# Altium PCB Pod_Islands_Panel.PcbDoc (part 3 of 10)
Units mm, origin at the board's own origin, x right, y up, seen from the top; angles counter-clockwise.
Board outline 95.7 x 83.7 mm, 6 copper layers (Top Layer, Inner1, Inner2, Inner3, Inner4, Bottom Layer), stack 0.82 mm thick; 1100 components, 940 nets, 4944 pads, 3680 vias.
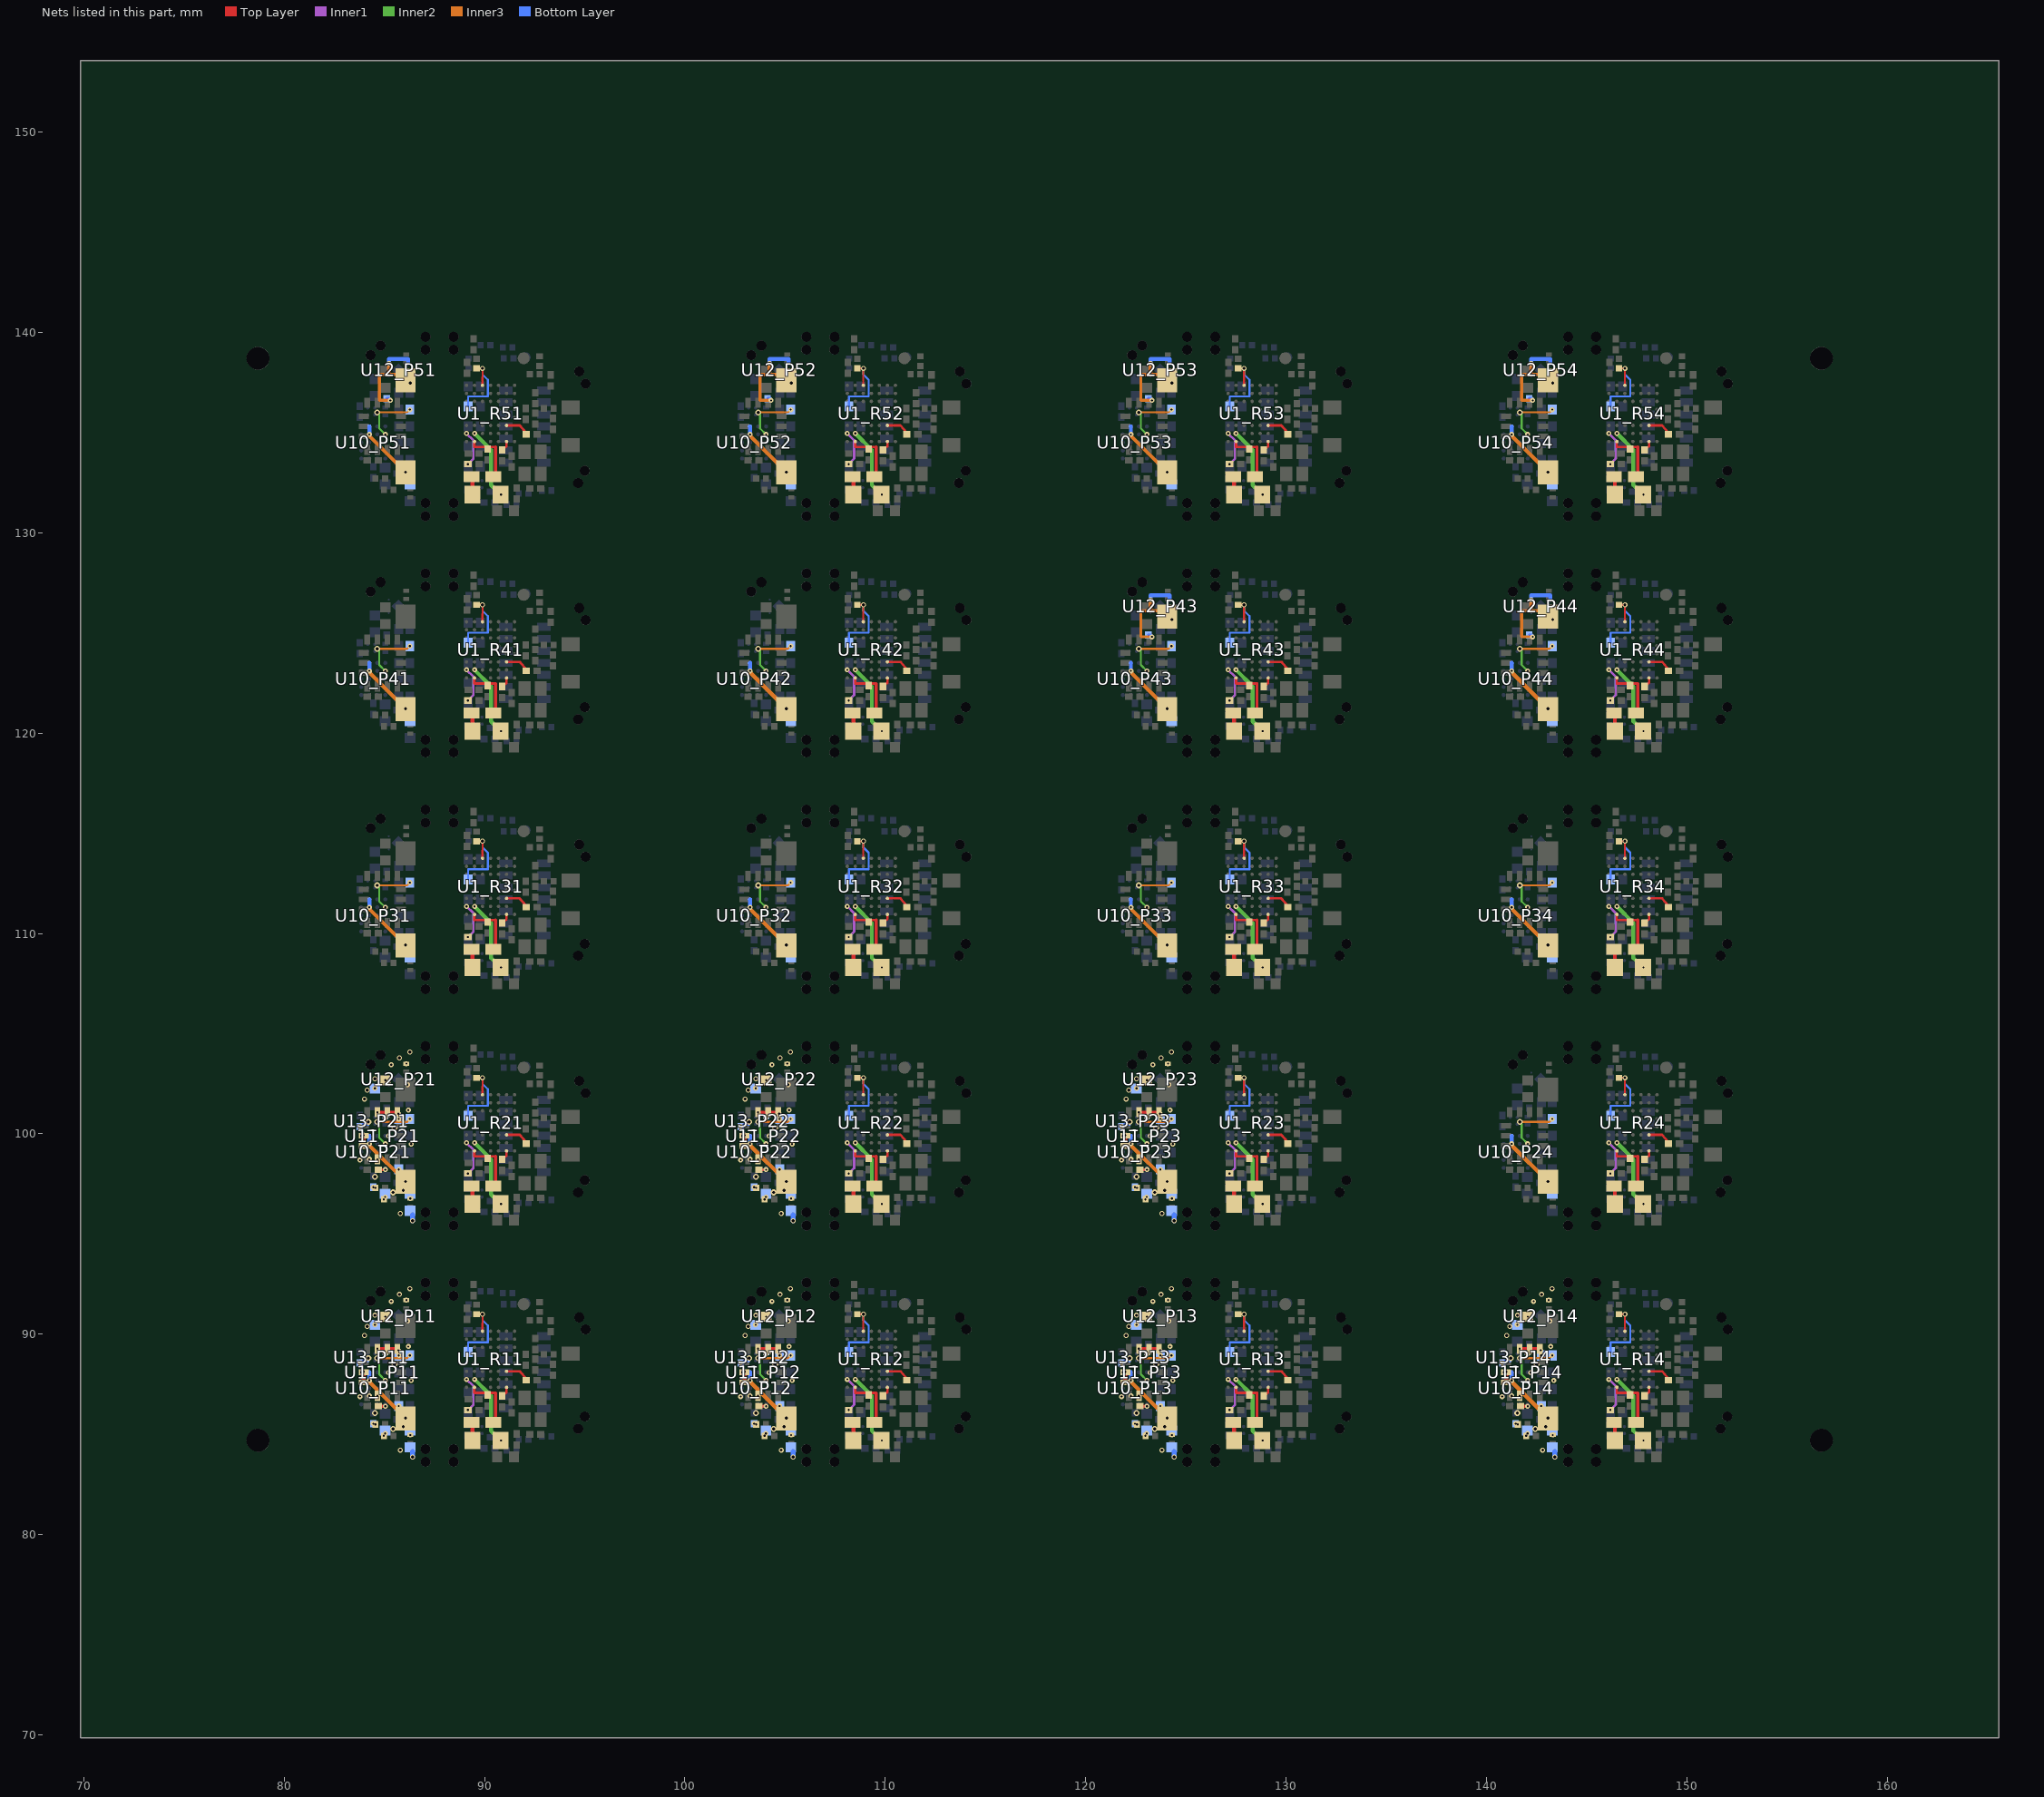
[diagram p7: the nets of this part, all layers, seen from the top]

## Via types
v1: diameter 0.249, hole 0.102, Top Layer to Inner1, 920 vias
v2: diameter 0.249, hole 0.102, Inner1 to Bottom Layer, 740 vias
v3: diameter 0.249, hole 0.102, Top Layer to Inner4, 580 vias
v4: diameter 0.249, hole 0.152, Top Layer to Bottom Layer, 540 vias
v5: diameter 0.249, hole 0.102, Inner4 to Bottom Layer, 520 vias
v6: diameter 0.3, hole 0.152, Inner1 to Inner4, 380 vias

## Nets (pads, with @x,y where several pads share a name; then routed paths per layer and width w, separated by ;. In a path a pad name is that pad's centre, name@x,y a point inside that pad or via, vN(x,y) a via of type N, cw(c..) or ccw(c..) an arc to the next point about the centre after c; other vN are vias at no path point) (continued)
CELL_N_P43: C55_P43.2 pad.BT2@124.059,125.8 U12_P43.2 U12_P43.3 | length 6.3
  Top Layer w0.3: pad.BT2@124.059,125.8 124.2,125.66 v4(124.3,125.66)
  Inner3 w0.15: v2(123.3,124.8) 122.75,124.8 122.75,126.1 123.226,126.1 124.3,126.1 v4(124.3,125.66)
  Inner3 w0.2: 123.226,126.1 v2(123.226,126.646)
  Bottom Layer w0.15: C55_P43.2@123.12,124.89 123.27,124.89 v2(123.3,124.8)
  Bottom Layer w0.2: v2(123.226,126.646) 123.226,126.87 124.176,126.87 U12_P43.3@124.176,126.646
CELL_N_P44: C55_P44.2 pad.BT2@143.058,125.8 U12_P44.2 U12_P44.3 | length 6.3
  Top Layer w0.3: pad.BT2@143.06,125.8 143.2,125.66 v4(143.3,125.66)
  Inner3 w0.15: v2(142.3,124.8) 141.75,124.8 141.75,126.1 142.226,126.1 143.3,126.1 v4(143.3,125.66)
  Inner3 w0.2: 142.226,126.1 v2(142.226,126.646)
  Bottom Layer w0.15: C55_P44.2@142.12,124.89 142.27,124.89 v2(142.3,124.8)
  Bottom Layer w0.2: v2(142.226,126.646) 142.226,126.87 143.176,126.87 U12_P44.3@143.176,126.646
CELL_N_P51: C55_P51.2 pad.BT2@86.058,137.601 U12_P51.2 U12_P51.3 | length 6.3
  Top Layer w0.3: pad.BT2@86.06,137.6 86.2,137.46 v4(86.3,137.46)
  Inner3 w0.15: v2(85.3,136.6) 84.75,136.6 84.75,137.9 85.226,137.9 86.3,137.9 v4(86.3,137.46)
  Inner3 w0.2: 85.226,137.9 v2(85.226,138.446)
  Bottom Layer w0.15: C55_P51.2@85.12,136.691 85.27,136.69 v2(85.3,136.6)
  Bottom Layer w0.2: v2(85.226,138.446) 85.226,138.67 86.176,138.67 U12_P51.3@86.176,138.446
CELL_N_P52: C55_P52.2 pad.BT2@105.06,137.601 U12_P52.2 U12_P52.3 | length 6.3
  Top Layer w0.3: pad.BT2@105.06,137.6 105.2,137.46 v4(105.3,137.46)
  Inner3 w0.15: v2(104.3,136.6) 103.75,136.6 103.75,137.9 104.226,137.9 105.3,137.9 v4(105.3,137.46)
  Inner3 w0.2: 104.226,137.9 v2(104.226,138.446)
  Bottom Layer w0.15: C55_P52.2@104.12,136.691 104.27,136.69 v2(104.3,136.6)
  Bottom Layer w0.2: v2(104.226,138.446) 104.226,138.67 105.176,138.67 U12_P52.3@105.176,138.446
CELL_N_P53: C55_P53.2 pad.BT2@124.059,137.601 U12_P53.2 U12_P53.3 | length 6.3
  Top Layer w0.3: pad.BT2@124.06,137.6 124.2,137.46 v4(124.3,137.46)
  Inner3 w0.15: v2(123.3,136.6) 122.75,136.6 122.75,137.9 123.226,137.9 124.3,137.9 v4(124.3,137.46)
  Inner3 w0.2: 123.226,137.9 v2(123.226,138.446)
  Bottom Layer w0.15: C55_P53.2@123.12,136.691 123.27,136.69 v2(123.3,136.6)
  Bottom Layer w0.2: v2(123.226,138.446) 123.226,138.67 124.176,138.67 U12_P53.3@124.176,138.446
CELL_N_P54: C55_P54.2 pad.BT2@143.058,137.601 U12_P54.2 U12_P54.3 | length 6.3
  Top Layer w0.3: pad.BT2@143.06,137.6 143.2,137.46 v4(143.3,137.46)
  Inner3 w0.15: v2(142.3,136.6) 141.75,136.6 141.75,137.9 142.226,137.9 143.3,137.9 v4(143.3,137.46)
  Inner3 w0.2: 142.226,137.9 v2(142.226,138.446)
  Bottom Layer w0.15: C55_P54.2@142.12,136.691 142.27,136.69 v2(142.3,136.6)
  Bottom Layer w0.2: v2(142.226,138.446) 142.226,138.67 143.176,138.67 U12_P54.3@143.176,138.446
CELL_P_P11: C52_P11.1 pad.BT1@86.058,85.8 R51_P11.1 U10_P11.A3 U10_P11.B3 | length 3.6
  Top Layer w0.3: pad.BT1@86.06,85.801 v4(86.06,85.82)
  Inner3 w0.2: v2(84.251,87.7) 84.251,87.625 86.06,85.816 v4(86.06,85.82)
  Bottom Layer w0.2: v2(84.251,87.7) U10_P11.A3@84.251,88.099
  Bottom Layer w0.25: v4(86.06,85.82) 86.06,85.782 R51_P11.1@86.093,85.75 ; R51_P11.1@86.093,85.748 86.2,85.64 C52_P11.1@86.2,85.35
CELL_P_P12: C52_P12.1 pad.BT1@105.06,85.8 R51_P12.1 U10_P12.A3 U10_P12.B3 | length 3.6
  Top Layer w0.3: pad.BT1@105.06,85.8 v4(105.06,85.82)
  Inner3 w0.2: v2(103.251,87.7) 103.251,87.625 105.06,85.816 v4(105.06,85.82)
  Bottom Layer w0.2: v2(103.251,87.7) U10_P12.A3@103.25,88.1
  Bottom Layer w0.25: v4(105.06,85.82) 105.06,85.782 R51_P12.1@105.092,85.75 ; R51_P12.1@105.093,85.748 105.2,85.64 C52_P12.1@105.2,85.35
CELL_P_P13: C52_P13.1 pad.BT1@124.059,85.8 R51_P13.1 U10_P13.A3 U10_P13.B3 | length 3.6
  Top Layer w0.3: pad.BT1@124.06,85.801 v4(124.06,85.82)
  Inner3 w0.2: v2(122.251,87.7) 122.251,87.625 124.06,85.816 v4(124.06,85.82)
  Bottom Layer w0.2: v2(122.251,87.7) U10_P13.A3@122.25,88.1
  Bottom Layer w0.25: v4(124.06,85.82) 124.06,85.782 R51_P13.1@124.092,85.75 ; R51_P13.1@124.093,85.748 124.2,85.64 C52_P13.1@124.2,85.35
CELL_P_P14: C52_P14.1 pad.BT1@143.058,85.8 R51_P14.1 U10_P14.A3 U10_P14.B3 | length 3.6
  Top Layer w0.3: pad.BT1@143.06,85.801 v4(143.06,85.82)
  Inner3 w0.2: v2(141.251,87.7) 141.251,87.625 143.06,85.816 v4(143.06,85.82)
  Bottom Layer w0.2: v2(141.251,87.7) U10_P14.A3@141.251,88.099
  Bottom Layer w0.25: v4(143.06,85.82) 143.06,85.782 R51_P14.1@143.093,85.75 ; R51_P14.1@143.093,85.748 143.2,85.64 C52_P14.1@143.2,85.35
CELL_P_P21: C52_P21.1 pad.BT1@86.058,97.601 R51_P21.1 U10_P21.A3 U10_P21.B3 | length 3.6
  Top Layer w0.3: pad.BT1@86.06,97.601 v4(86.06,97.62)
  Inner3 w0.2: v2(84.251,99.5) 84.251,99.425 86.06,97.616 v4(86.06,97.62)
  Bottom Layer w0.2: v2(84.251,99.5) U10_P21.A3@84.251,99.899
  Bottom Layer w0.25: v4(86.06,97.62) 86.06,97.582 R51_P21.1@86.093,97.55 ; R51_P21.1@86.093,97.548 86.2,97.44 C52_P21.1@86.2,97.15
CELL_P_P22: C52_P22.1 pad.BT1@105.06,97.601 R51_P22.1 U10_P22.A3 U10_P22.B3 | length 3.6
  Top Layer w0.3: pad.BT1@105.06,97.601 v4(105.06,97.62)
  Inner3 w0.2: v2(103.251,99.5) 103.251,99.425 105.06,97.616 v4(105.06,97.62)
  Bottom Layer w0.2: v2(103.251,99.5) U10_P22.A3@103.251,99.899
  Bottom Layer w0.25: v4(105.06,97.62) 105.06,97.582 R51_P22.1@105.093,97.55 ; R51_P22.1@105.093,97.548 105.2,97.44 C52_P22.1@105.2,97.15
CELL_P_P23: C52_P23.1 pad.BT1@124.059,97.601 R51_P23.1 U10_P23.A3 U10_P23.B3 | length 3.6
  Top Layer w0.3: pad.BT1@124.06,97.601 v4(124.06,97.62)
  Inner3 w0.2: v2(122.251,99.5) 122.251,99.425 124.06,97.616 v4(124.06,97.62)
  Bottom Layer w0.2: v2(122.251,99.5) U10_P23.A3@122.251,99.899
  Bottom Layer w0.25: v4(124.06,97.62) 124.06,97.582 R51_P23.1@124.093,97.55 ; R51_P23.1@124.093,97.548 124.2,97.44 C52_P23.1@124.2,97.15
CELL_P_P24: C52_P24.1 pad.BT1@143.058,97.601 R51_P24.1 U10_P24.A3 U10_P24.B3 | length 3.6
  Top Layer w0.3: pad.BT1@143.06,97.601 v4(143.06,97.62)
  Inner3 w0.2: v2(141.251,99.5) 141.251,99.425 143.06,97.616 v4(143.06,97.62)
  Bottom Layer w0.2: v2(141.251,99.5) U10_P24.A3@141.251,99.899
  Bottom Layer w0.25: v4(143.06,97.62) 143.06,97.582 R51_P24.1@143.093,97.55 ; R51_P24.1@143.093,97.548 143.2,97.44 C52_P24.1@143.2,97.15
CELL_P_P31: C52_P31.1 pad.BT1@86.058,109.4 R51_P31.1 U10_P31.A3 U10_P31.B3 | length 3.6
  Top Layer w0.3: pad.BT1@86.06,109.401 v4(86.06,109.42)
  Inner3 w0.2: v2(84.251,111.3) 84.251,111.225 86.06,109.416 v4(86.06,109.42)
  Bottom Layer w0.2: v2(84.251,111.3) U10_P31.A3@84.251,111.699
  Bottom Layer w0.25: v4(86.06,109.42) 86.06,109.382 R51_P31.1@86.093,109.35 ; R51_P31.1@86.093,109.348 86.2,109.24 C52_P31.1@86.2,108.95
CELL_P_P32: C52_P32.1 pad.BT1@105.06,109.4 R51_P32.1 U10_P32.A3 U10_P32.B3 | length 3.6
  Top Layer w0.3: pad.BT1@105.06,109.4 v4(105.06,109.42)
  Inner3 w0.2: v2(103.251,111.3) 103.251,111.225 105.06,109.416 v4(105.06,109.42)
  Bottom Layer w0.2: v2(103.251,111.3) U10_P32.A3@103.25,111.7
  Bottom Layer w0.25: v4(105.06,109.42) 105.06,109.382 R51_P32.1@105.092,109.35 ; R51_P32.1@105.093,109.348 105.2,109.24 C52_P32.1@105.2,108.95
CELL_P_P33: C52_P33.1 pad.BT1@124.059,109.4 R51_P33.1 U10_P33.A3 U10_P33.B3 | length 3.6
  Top Layer w0.3: pad.BT1@124.06,109.401 v4(124.06,109.42)
  Inner3 w0.2: v2(122.251,111.3) 122.251,111.225 124.06,109.416 v4(124.06,109.42)
  Bottom Layer w0.2: v2(122.251,111.3) U10_P33.A3@122.25,111.7
  Bottom Layer w0.25: v4(124.06,109.42) 124.06,109.382 R51_P33.1@124.092,109.35 ; R51_P33.1@124.093,109.348 124.2,109.24 C52_P33.1@124.2,108.95
CELL_P_P34: C52_P34.1 pad.BT1@143.058,109.4 R51_P34.1 U10_P34.A3 U10_P34.B3 | length 3.6
  Top Layer w0.3: pad.BT1@143.06,109.401 v4(143.06,109.42)
  Inner3 w0.2: v2(141.251,111.3) 141.251,111.225 143.06,109.416 v4(143.06,109.42)
  Bottom Layer w0.2: v2(141.251,111.3) U10_P34.A3@141.251,111.699
  Bottom Layer w0.25: v4(143.06,109.42) 143.06,109.382 R51_P34.1@143.093,109.35 ; R51_P34.1@143.093,109.348 143.2,109.24 C52_P34.1@143.2,108.95
CELL_P_P41: C52_P41.1 pad.BT1@86.058,121.2 R51_P41.1 U10_P41.A3 U10_P41.B3 | length 3.6
  Top Layer w0.3: pad.BT1@86.06,121.201 v4(86.06,121.22)
  Inner3 w0.2: v2(84.251,123.1) 84.251,123.025 86.06,121.216 v4(86.06,121.22)
  Bottom Layer w0.2: v2(84.251,123.1) U10_P41.A3@84.251,123.499
  Bottom Layer w0.25: v4(86.06,121.22) 86.06,121.182 R51_P41.1@86.093,121.15 ; R51_P41.1@86.093,121.148 86.2,121.04 C52_P41.1@86.2,120.75
CELL_P_P42: C52_P42.1 pad.BT1@105.06,121.2 R51_P42.1 U10_P42.A3 U10_P42.B3 | length 3.6
  Top Layer w0.3: pad.BT1@105.06,121.2 v4(105.06,121.22)
  Inner3 w0.2: v2(103.251,123.1) 103.251,123.025 105.06,121.216 v4(105.06,121.22)
  Bottom Layer w0.2: v2(103.251,123.1) U10_P42.A3@103.25,123.5
  Bottom Layer w0.25: v4(105.06,121.22) 105.06,121.182 R51_P42.1@105.092,121.15 ; R51_P42.1@105.093,121.148 105.2,121.04 C52_P42.1@105.2,120.75
CELL_P_P43: C52_P43.1 pad.BT1@124.059,121.2 R51_P43.1 U10_P43.A3 U10_P43.B3 | length 3.6
  Top Layer w0.3: pad.BT1@124.06,121.201 v4(124.06,121.22)
  Inner3 w0.2: v2(122.251,123.1) 122.251,123.025 124.06,121.216 v4(124.06,121.22)
  Bottom Layer w0.2: v2(122.251,123.1) U10_P43.A3@122.25,123.5
  Bottom Layer w0.25: v4(124.06,121.22) 124.06,121.182 R51_P43.1@124.092,121.15 ; R51_P43.1@124.093,121.148 124.2,121.04 C52_P43.1@124.2,120.75
CELL_P_P44: C52_P44.1 pad.BT1@143.058,121.2 R51_P44.1 U10_P44.A3 U10_P44.B3 | length 3.6
  Top Layer w0.3: pad.BT1@143.06,121.201 v4(143.06,121.22)
  Inner3 w0.2: v2(141.251,123.1) 141.251,123.025 143.06,121.216 v4(143.06,121.22)
  Bottom Layer w0.2: v2(141.251,123.1) U10_P44.A3@141.251,123.499
  Bottom Layer w0.25: v4(143.06,121.22) 143.06,121.182 R51_P44.1@143.093,121.15 ; R51_P44.1@143.093,121.148 143.2,121.04 C52_P44.1@143.2,120.75
CELL_P_P51: C52_P51.1 pad.BT1@86.058,133.001 R51_P51.1 U10_P51.A3 U10_P51.B3 | length 3.6
  Top Layer w0.3: pad.BT1@86.06,133.001 v4(86.06,133.02)
  Inner3 w0.2: v2(84.251,134.9) 84.251,134.825 86.06,133.016 v4(86.06,133.02)
  Bottom Layer w0.2: v2(84.251,134.9) U10_P51.A3@84.251,135.299
  Bottom Layer w0.25: v4(86.06,133.02) 86.06,132.982 R51_P51.1@86.093,132.95 ; R51_P51.1@86.093,132.948 86.2,132.84 C52_P51.1@86.2,132.55
CELL_P_P52: C52_P52.1 pad.BT1@105.06,133.001 R51_P52.1 U10_P52.A3 U10_P52.B3 | length 3.6
  Top Layer w0.3: pad.BT1@105.06,133.001 v4(105.06,133.02)
  Inner3 w0.2: v2(103.251,134.9) 103.251,134.825 105.06,133.016 v4(105.06,133.02)
  Bottom Layer w0.2: v2(103.251,134.9) U10_P52.A3@103.251,135.299
  Bottom Layer w0.25: v4(105.06,133.02) 105.06,132.982 R51_P52.1@105.093,132.95 ; R51_P52.1@105.093,132.948 105.2,132.84 C52_P52.1@105.2,132.55
CELL_P_P53: C52_P53.1 pad.BT1@124.059,133.001 R51_P53.1 U10_P53.A3 U10_P53.B3 | length 3.6
  Top Layer w0.3: pad.BT1@124.06,133.001 v4(124.06,133.02)
  Inner3 w0.2: v2(122.251,134.9) 122.251,134.825 124.06,133.016 v4(124.06,133.02)
  Bottom Layer w0.2: v2(122.251,134.9) U10_P53.A3@122.251,135.299
  Bottom Layer w0.25: v4(124.06,133.02) 124.06,132.982 R51_P53.1@124.093,132.95 ; R51_P53.1@124.093,132.948 124.2,132.84 C52_P53.1@124.2,132.55
CELL_P_P54: C52_P54.1 pad.BT1@143.058,133.001 R51_P54.1 U10_P54.A3 U10_P54.B3 | length 3.6
  Top Layer w0.3: pad.BT1@143.06,133.001 v4(143.06,133.02)
  Inner3 w0.2: v2(141.251,134.9) 141.251,134.825 143.06,133.016 v4(143.06,133.02)
  Bottom Layer w0.2: v2(141.251,134.9) U10_P54.A3@141.251,135.299
  Bottom Layer w0.25: v4(143.06,133.02) 143.06,132.982 R51_P54.1@143.093,132.95 ; R51_P54.1@143.093,132.948 143.2,132.84 C52_P54.1@143.2,132.55
CHG_PG_P11: pad.JP4@86.274,88.94 U10_P11.B1 | length 2.9
  Inner2 w0.1: v6(84.65,88.8) 84.75,88.7 84.75,88 v2(85.051,87.7)
  Inner3 w0.1: v6(84.65,88.8) 86.135,88.8 v2(86.275,88.94)
CHG_PG_P12: pad.JP4@105.276,88.94 U10_P12.B1 | length 2.9
  Inner2 w0.1: v6(103.65,88.8) 103.75,88.7 103.75,88 v2(104.051,87.7)
  Inner3 w0.1: v6(103.65,88.8) 105.135,88.8 v2(105.275,88.94)
CHG_PG_P13: pad.JP4@124.275,88.94 U10_P13.B1 | length 2.9
  Inner2 w0.1: v6(122.65,88.8) 122.75,88.7 122.75,88 v2(123.051,87.7)
  Inner3 w0.1: v6(122.65,88.8) 124.135,88.8 v2(124.275,88.94)
CHG_PG_P14: pad.JP4@143.274,88.94 U10_P14.B1 | length 2.9
  Inner2 w0.1: v6(141.65,88.8) 141.75,88.7 141.75,88 v2(142.051,87.7)
  Inner3 w0.1: v6(141.65,88.8) 143.135,88.8 v2(143.275,88.94)
CHG_PG_P21: pad.JP4@86.274,100.741 U10_P21.B1 | length 2.9
  Inner2 w0.1: v6(84.65,100.6) 84.75,100.5 84.75,99.8 v2(85.051,99.5)
  Inner3 w0.1: v6(84.65,100.6) 86.135,100.6 v2(86.275,100.74)
CHG_PG_P22: pad.JP4@105.276,100.741 U10_P22.B1 | length 2.9
  Inner2 w0.1: v6(103.65,100.6) 103.75,100.5 103.75,99.8 v2(104.051,99.5)
  Inner3 w0.1: v6(103.65,100.6) 105.135,100.6 v2(105.275,100.74)
CHG_PG_P23: pad.JP4@124.275,100.741 U10_P23.B1 | length 2.9
  Inner2 w0.1: v6(122.65,100.6) 122.75,100.5 122.75,99.8 v2(123.051,99.5)
  Inner3 w0.1: v6(122.65,100.6) 124.135,100.6 v2(124.275,100.74)
CHG_PG_P24: pad.JP4@143.274,100.741 U10_P24.B1 | length 2.9
  Inner2 w0.1: v6(141.65,100.6) 141.75,100.5 141.75,99.8 v2(142.051,99.5)
  Inner3 w0.1: v6(141.65,100.6) 143.135,100.6 v2(143.275,100.74)
CHG_PG_P31: pad.JP4@86.274,112.539 U10_P31.B1 | length 2.9
  Inner2 w0.1: v6(84.65,112.4) 84.75,112.3 84.75,111.6 v2(85.051,111.3)
  Inner3 w0.1: v6(84.65,112.4) 86.135,112.4 v2(86.275,112.54)
CHG_PG_P32: pad.JP4@105.276,112.539 U10_P32.B1 | length 2.9
  Inner2 w0.1: v6(103.65,112.4) 103.75,112.3 103.75,111.6 v2(104.051,111.3)
  Inner3 w0.1: v6(103.65,112.4) 105.135,112.4 v2(105.275,112.54)
CHG_PG_P33: pad.JP4@124.275,112.539 U10_P33.B1 | length 2.9
  Inner2 w0.1: v6(122.65,112.4) 122.75,112.3 122.75,111.6 v2(123.051,111.3)
  Inner3 w0.1: v6(122.65,112.4) 124.135,112.4 v2(124.275,112.54)
CHG_PG_P34: pad.JP4@143.274,112.539 U10_P34.B1 | length 2.9
  Inner2 w0.1: v6(141.65,112.4) 141.75,112.3 141.75,111.6 v2(142.051,111.3)
  Inner3 w0.1: v6(141.65,112.4) 143.135,112.4 v2(143.275,112.54)
CHG_PG_P41: pad.JP4@86.274,124.34 U10_P41.B1 | length 2.9
  Inner2 w0.1: v6(84.65,124.2) 84.75,124.1 84.75,123.4 v2(85.051,123.1)
  Inner3 w0.1: v6(84.65,124.2) 86.135,124.2 v2(86.275,124.34)
CHG_PG_P42: pad.JP4@105.276,124.34 U10_P42.B1 | length 2.9
  Inner2 w0.1: v6(103.65,124.2) 103.75,124.1 103.75,123.4 v2(104.051,123.1)
  Inner3 w0.1: v6(103.65,124.2) 105.135,124.2 v2(105.275,124.34)
CHG_PG_P43: pad.JP4@124.275,124.34 U10_P43.B1 | length 2.9
  Inner2 w0.1: v6(122.65,124.2) 122.75,124.1 122.75,123.4 v2(123.051,123.1)
  Inner3 w0.1: v6(122.65,124.2) 124.135,124.2 v2(124.275,124.34)
CHG_PG_P44: pad.JP4@143.274,124.34 U10_P44.B1 | length 2.9
  Inner2 w0.1: v6(141.65,124.2) 141.75,124.1 141.75,123.4 v2(142.051,123.1)
  Inner3 w0.1: v6(141.65,124.2) 143.135,124.2 v2(143.275,124.34)
CHG_PG_P51: pad.JP4@86.274,136.141 U10_P51.B1 | length 2.9
  Inner2 w0.1: v6(84.65,136) 84.75,135.9 84.75,135.2 v2(85.051,134.9)
  Inner3 w0.1: v6(84.65,136) 86.135,136 v2(86.275,136.14)
CHG_PG_P52: pad.JP4@105.276,136.141 U10_P52.B1 | length 2.9
  Inner2 w0.1: v6(103.65,136) 103.75,135.9 103.75,135.2 v2(104.051,134.9)
  Inner3 w0.1: v6(103.65,136) 105.135,136 v2(105.275,136.14)
CHG_PG_P53: pad.JP4@124.275,136.141 U10_P53.B1 | length 2.9
  Inner2 w0.1: v6(122.65,136) 122.75,135.9 122.75,135.2 v2(123.051,134.9)
  Inner3 w0.1: v6(122.65,136) 124.135,136 v2(124.275,136.14)
CHG_PG_P54: pad.JP4@143.274,136.141 U10_P54.B1 | length 2.9
  Inner2 w0.1: v6(141.65,136) 141.75,135.9 141.75,135.2 v2(142.051,134.9)
  Inner3 w0.1: v6(141.65,136) 143.135,136 v2(143.275,136.14)
CHG_PG_R11: pad.JR4@89.185,89.1 R3_R11.2 U1_R11.H5 | length 4.2
  Top Layer w0.1: R3_R11.2@89.599,90.998 89.897,90.997 v4(89.9,91) U1_R11.H5@89.899,90.149
  Bottom Layer w0.1: pad.JR4@89.185,89.1 89.185,89.6 90.17,89.6 90.17,90.43 89.9,90.7 v4(89.9,91)
CHG_PG_R12: pad.JR4@108.184,89.1 R3_R12.2 U1_R12.H5 | length 4.2
  Top Layer w0.1: R3_R12.2@108.599,90.998 108.897,90.997 v4(108.9,91) U1_R12.H5@108.9,90.15
  Bottom Layer w0.1: pad.JR4@108.185,89.1 108.185,89.6 109.17,89.6 109.17,90.43 108.9,90.7 v4(108.9,91)
CHG_PG_R13: pad.JR4@127.186,89.1 R3_R13.2 U1_R13.H5 | length 4.2
  Top Layer w0.1: R3_R13.2@127.599,90.998 127.897,90.997 v4(127.9,91) U1_R13.H5@127.9,90.15
  Bottom Layer w0.1: pad.JR4@127.186,89.1 127.185,89.6 128.17,89.6 128.17,90.43 127.9,90.7 v4(127.9,91)
CHG_PG_R14: pad.JR4@146.185,89.1 R3_R14.2 U1_R14.H5 | length 4.2
  Top Layer w0.1: R3_R14.2@146.599,90.998 146.897,90.997 v4(146.9,91) U1_R14.H5@146.899,90.149
  Bottom Layer w0.1: pad.JR4@146.185,89.1 146.185,89.6 147.17,89.6 147.17,90.43 146.9,90.7 v4(146.9,91)
CHG_PG_R21: pad.JR4@89.185,100.901 R3_R21.2 U1_R21.H5 | length 4.2
  Top Layer w0.1: R3_R21.2@89.599,102.797 89.897,102.797 v4(89.9,102.8) U1_R21.H5@89.899,101.949
  Bottom Layer w0.1: pad.JR4@89.185,100.9 89.185,101.4 90.17,101.4 90.17,102.23 89.9,102.5 v4(89.9,102.8)
CHG_PG_R22: pad.JR4@108.184,100.901 R3_R22.2 U1_R22.H5 | length 4.2
  Top Layer w0.1: R3_R22.2@108.599,102.797 108.897,102.797 v4(108.9,102.8) U1_R22.H5@108.899,101.949
  Bottom Layer w0.1: pad.JR4@108.185,100.9 108.185,101.4 109.17,101.4 109.17,102.23 108.9,102.5 v4(108.9,102.8)
CHG_PG_R23: pad.JR4@127.186,100.901 R3_R23.2 U1_R23.H5 | length 4.2
  Top Layer w0.1: R3_R23.2@127.599,102.797 127.897,102.797 v4(127.9,102.8) U1_R23.H5@127.899,101.949
  Bottom Layer w0.1: pad.JR4@127.185,100.9 127.185,101.4 128.17,101.4 128.17,102.23 127.9,102.5 v4(127.9,102.8)
CHG_PG_R24: pad.JR4@146.185,100.901 R3_R24.2 U1_R24.H5 | length 4.2
  Top Layer w0.1: R3_R24.2@146.599,102.797 146.897,102.797 v4(146.9,102.8) U1_R24.H5@146.899,101.949
  Bottom Layer w0.1: pad.JR4@146.185,100.9 146.185,101.4 147.17,101.4 147.17,102.23 146.9,102.5 v4(146.9,102.8)
CHG_PG_R31: pad.JR4@89.185,112.699 R3_R31.2 U1_R31.H5 | length 4.2
  Top Layer w0.1: R3_R31.2@89.599,114.598 89.897,114.597 v4(89.9,114.6) U1_R31.H5@89.899,113.749
  Bottom Layer w0.1: pad.JR4@89.185,112.699 89.185,113.2 90.17,113.2 90.17,114.03 89.9,114.3 v4(89.9,114.6)
CHG_PG_R32: pad.JR4@108.184,112.699 R3_R32.2 U1_R32.H5 | length 4.2
  Top Layer w0.1: R3_R32.2@108.599,114.598 108.897,114.597 v4(108.9,114.6) U1_R32.H5@108.9,113.75
  Bottom Layer w0.1: pad.JR4@108.185,112.7 108.185,113.2 109.17,113.2 109.17,114.03 108.9,114.3 v4(108.9,114.6)
CHG_PG_R33: pad.JR4@127.186,112.699 R3_R33.2 U1_R33.H5 | length 4.2
  Top Layer w0.1: R3_R33.2@127.599,114.598 127.897,114.597 v4(127.9,114.6) U1_R33.H5@127.9,113.75
  Bottom Layer w0.1: pad.JR4@127.186,112.699 127.185,113.2 128.17,113.2 128.17,114.03 127.9,114.3 v4(127.9,114.6)
CHG_PG_R34: pad.JR4@146.185,112.699 R3_R34.2 U1_R34.H5 | length 4.2
  Top Layer w0.1: R3_R34.2@146.599,114.598 146.897,114.597 v4(146.9,114.6) U1_R34.H5@146.899,113.749
  Bottom Layer w0.1: pad.JR4@146.185,112.699 146.185,113.2 147.17,113.2 147.17,114.03 146.9,114.3 v4(146.9,114.6)
CHG_PG_R41: pad.JR4@89.185,124.5 R3_R41.2 U1_R41.H5 | length 4.2
  Top Layer w0.1: R3_R41.2@89.599,126.398 89.897,126.397 v4(89.9,126.4) U1_R41.H5@89.899,125.549
  Bottom Layer w0.1: pad.JR4@89.185,124.5 89.185,125 90.17,125 90.17,125.83 89.9,126.1 v4(89.9,126.4)
CHG_PG_R42: pad.JR4@108.184,124.5 R3_R42.2 U1_R42.H5 | length 4.2
  Top Layer w0.1: R3_R42.2@108.599,126.398 108.897,126.397 v4(108.9,126.4) U1_R42.H5@108.9,125.55
  Bottom Layer w0.1: pad.JR4@108.185,124.5 108.185,125 109.17,125 109.17,125.83 108.9,126.1 v4(108.9,126.4)
CHG_PG_R43: pad.JR4@127.186,124.5 R3_R43.2 U1_R43.H5 | length 4.2
  Top Layer w0.1: R3_R43.2@127.599,126.398 127.897,126.397 v4(127.9,126.4) U1_R43.H5@127.9,125.55
  Bottom Layer w0.1: pad.JR4@127.186,124.5 127.185,125 128.17,125 128.17,125.83 127.9,126.1 v4(127.9,126.4)
CHG_PG_R44: pad.JR4@146.185,124.5 R3_R44.2 U1_R44.H5 | length 4.2
  Top Layer w0.1: R3_R44.2@146.599,126.398 146.897,126.397 v4(146.9,126.4) U1_R44.H5@146.899,125.549
  Bottom Layer w0.1: pad.JR4@146.185,124.5 146.185,125 147.17,125 147.17,125.83 146.9,126.1 v4(146.9,126.4)
CHG_PG_R51: pad.JR4@89.185,136.301 R3_R51.2 U1_R51.H5 | length 4.2
  Top Layer w0.1: R3_R51.2@89.599,138.197 89.897,138.197 v4(89.9,138.2) U1_R51.H5@89.899,137.349
  Bottom Layer w0.1: pad.JR4@89.185,136.3 89.185,136.8 90.17,136.8 90.17,137.63 89.9,137.9 v4(89.9,138.2)
CHG_PG_R52: pad.JR4@108.184,136.301 R3_R52.2 U1_R52.H5 | length 4.2
  Top Layer w0.1: R3_R52.2@108.599,138.197 108.897,138.197 v4(108.9,138.2) U1_R52.H5@108.899,137.349
  Bottom Layer w0.1: pad.JR4@108.185,136.3 108.185,136.8 109.17,136.8 109.17,137.63 108.9,137.9 v4(108.9,138.2)
CHG_PG_R53: pad.JR4@127.186,136.301 R3_R53.2 U1_R53.H5 | length 4.2
  Top Layer w0.1: R3_R53.2@127.599,138.197 127.897,138.197 v4(127.9,138.2) U1_R53.H5@127.899,137.349
  Bottom Layer w0.1: pad.JR4@127.185,136.3 127.185,136.8 128.17,136.8 128.17,137.63 127.9,137.9 v4(127.9,138.2)
CHG_PG_R54: pad.JR4@146.185,136.301 R3_R54.2 U1_R54.H5 | length 4.2
  Top Layer w0.1: R3_R54.2@146.599,138.197 146.897,138.197 v4(146.9,138.2) U1_R54.H5@146.899,137.349
  Bottom Layer w0.1: pad.JR4@146.185,136.3 146.185,136.8 147.17,136.8 147.17,137.63 146.9,137.9 v4(146.9,138.2)
DCC_L_R11: L1_R11.2 L2_R11.1 | length 0.9
  Top Layer w0.2: L2_R11.1@89.355,85.6 89.401,85.554 L1_R11.2@89.401,84.701
DCC_L_R12: L1_R12.2 L2_R12.1 | length 0.9
  Top Layer w0.2: L2_R12.1@108.355,85.6 108.401,85.554 L1_R12.2@108.401,84.701
DCC_L_R13: L1_R13.2 L2_R13.1 | length 0.9
  Top Layer w0.2: L2_R13.1@127.355,85.6 127.401,85.554 L1_R13.2@127.401,84.701
DCC_L_R14: L1_R14.2 L2_R14.1 | length 0.9
  Top Layer w0.2: L2_R14.1@146.355,85.6 146.401,85.554 L1_R14.2@146.401,84.701
DCC_L_R21: L1_R21.2 L2_R21.1 | length 0.9
  Top Layer w0.2: L2_R21.1@89.355,97.4 89.401,97.354 L1_R21.2@89.4,96.5
DCC_L_R22: L1_R22.2 L2_R22.1 | length 0.9
  Top Layer w0.2: L2_R22.1@108.355,97.4 108.401,97.354 L1_R22.2@108.401,96.501
DCC_L_R23: L1_R23.2 L2_R23.1 | length 0.9
  Top Layer w0.2: L2_R23.1@127.355,97.4 127.401,97.354 L1_R23.2@127.4,96.5
DCC_L_R24: L1_R24.2 L2_R24.1 | length 0.9
  Top Layer w0.2: L2_R24.1@146.355,97.4 146.401,97.354 L1_R24.2@146.4,96.5
DCC_L_R31: L1_R31.2 L2_R31.1 | length 0.9
  Top Layer w0.2: L2_R31.1@89.355,109.2 89.401,109.154 L1_R31.2@89.4,108.3
DCC_L_R32: L1_R32.2 L2_R32.1 | length 0.9
  Top Layer w0.2: L2_R32.1@108.355,109.2 108.401,109.154 L1_R32.2@108.401,108.301
DCC_L_R33: L1_R33.2 L2_R33.1 | length 0.9
  Top Layer w0.2: L2_R33.1@127.355,109.2 127.401,109.154 L1_R33.2@127.4,108.3
DCC_L_R34: L1_R34.2 L2_R34.1 | length 0.9
  Top Layer w0.2: L2_R34.1@146.355,109.2 146.401,109.154 L1_R34.2@146.4,108.3
DCC_L_R41: L1_R41.2 L2_R41.1 | length 0.9
  Top Layer w0.2: L2_R41.1@89.355,121 89.401,120.954 L1_R41.2@89.401,120.101
DCC_L_R42: L1_R42.2 L2_R42.1 | length 0.9
  Top Layer w0.2: L2_R42.1@108.355,121 108.401,120.954 L1_R42.2@108.401,120.101
DCC_L_R43: L1_R43.2 L2_R43.1 | length 0.9
  Top Layer w0.2: L2_R43.1@127.355,121 127.401,120.954 L1_R43.2@127.401,120.101
DCC_L_R44: L1_R44.2 L2_R44.1 | length 0.9
  Top Layer w0.2: L2_R44.1@146.355,121 146.401,120.954 L1_R44.2@146.401,120.101
DCC_L_R51: L1_R51.2 L2_R51.1 | length 0.9
  Top Layer w0.2: L2_R51.1@89.355,132.8 89.401,132.754 L1_R51.2@89.4,131.9
DCC_L_R52: L1_R52.2 L2_R52.1 | length 0.9
  Top Layer w0.2: L2_R52.1@108.355,132.8 108.401,132.754 L1_R52.2@108.401,131.901
DCC_L_R53: L1_R53.2 L2_R53.1 | length 0.9
  Top Layer w0.2: L2_R53.1@127.355,132.8 127.401,132.754 L1_R53.2@127.4,131.9
DCC_L_R54: L1_R54.2 L2_R54.1 | length 0.9
  Top Layer w0.2: L2_R54.1@146.355,132.8 146.401,132.754 L1_R54.2@146.4,131.9
DCC_R11: L1_R11.1 U1_R11.B6 | length 3.6
  Inner2 w0.2: v3(89.5,87.751) 90.325,86.926 90.325,85.175 v3(90.82,84.701)
DCC_R12: L1_R12.1 U1_R12.B6 | length 3.6
  Inner2 w0.2: v3@108.5,87.751 109.325,86.926 109.325,85.175 v3(109.82,84.701)
  other v3: 108.5,87.751
DCC_R13: L1_R13.1 U1_R13.B6 | length 3.6
  Inner2 w0.2: v3(127.5,87.751) 128.325,86.926 128.325,85.175 v3(128.82,84.701)
DCC_R14: L1_R14.1 U1_R14.B6 | length 3.6
  Inner2 w0.2: v3(146.5,87.751) 147.325,86.926 147.325,85.175 v3(147.82,84.701)
DCC_R21: L1_R21.1 U1_R21.B6 | length 3.6
  Inner2 w0.2: v3(89.5,99.551) 90.325,98.726 90.325,96.975 v3(90.82,96.501)
DCC_R22: L1_R22.1 U1_R22.B6 | length 3.6
  Inner2 w0.2: v3@108.5,99.551 109.325,98.726 109.325,96.975 v3(109.82,96.501)
  other v3: 108.5,99.551
DCC_R23: L1_R23.1 U1_R23.B6 | length 3.6
  Inner2 w0.2: v3(127.5,99.551) 128.325,98.726 128.325,96.975 v3(128.82,96.501)
DCC_R24: L1_R24.1 U1_R24.B6 | length 3.6
  Inner2 w0.2: v3(146.5,99.551) 147.325,98.726 147.325,96.975 v3(147.82,96.501)
DCC_R31: L1_R31.1 U1_R31.B6 | length 3.6
  Inner2 w0.2: v3(89.5,111.351) 90.325,110.526 90.325,108.775 v3(90.82,108.301)
DCC_R32: L1_R32.1 U1_R32.B6 | length 3.6
  Inner2 w0.2: v3@108.5,111.351 109.325,110.526 109.325,108.775 v3(109.82,108.301)
  other v3: 108.5,111.351
DCC_R33: L1_R33.1 U1_R33.B6 | length 3.6
  Inner2 w0.2: v3(127.5,111.351) 128.325,110.526 128.325,108.775 v3(128.82,108.301)
DCC_R34: L1_R34.1 U1_R34.B6 | length 3.6
  Inner2 w0.2: v3(146.5,111.351) 147.325,110.526 147.325,108.775 v3(147.82,108.301)
DCC_R41: L1_R41.1 U1_R41.B6 | length 3.6
  Inner2 w0.2: v3(89.5,123.151) 90.325,122.326 90.325,120.575 v3(90.82,120.101)
DCC_R42: L1_R42.1 U1_R42.B6 | length 3.6
  Inner2 w0.2: v3@108.5,123.151 109.325,122.326 109.325,120.575 v3(109.82,120.101)
  other v3: 108.5,123.151
DCC_R43: L1_R43.1 U1_R43.B6 | length 3.6
  Inner2 w0.2: v3(127.5,123.151) 128.325,122.326 128.325,120.575 v3(128.82,120.101)
DCC_R44: L1_R44.1 U1_R44.B6 | length 3.6
  Inner2 w0.2: v3(146.5,123.151) 147.325,122.326 147.325,120.575 v3(147.82,120.101)
DCC_R51: L1_R51.1 U1_R51.B6 | length 3.6
  Inner2 w0.2: v3(89.5,134.951) 90.325,134.126 90.325,132.375 v3(90.82,131.901)
DCC_R52: L1_R52.1 U1_R52.B6 | length 3.6
  Inner2 w0.2: v3@108.5,134.951 109.325,134.126 109.325,132.375 v3(109.82,131.901)
  other v3: 108.5,134.951
DCC_R53: L1_R53.1 U1_R53.B6 | length 3.6
  Inner2 w0.2: v3(127.5,134.951) 128.325,134.126 128.325,132.375 v3(128.82,131.901)
DCC_R54: L1_R54.1 U1_R54.B6 | length 3.6
  Inner2 w0.2: v3(146.5,134.951) 147.325,134.126 147.325,132.375 v3(147.82,131.901)
DEC1_R11: C4_R11.1 U1_R11.B7 | length 1.8
  Inner1 w0.12: v1(89.101,87.751) 89.445,87.407 89.445,86.495 v1(89.17,86.22)
DEC1_R12: C4_R12.1 U1_R12.B7 | length 1.8
  Inner1 w0.12: v1@108.101,87.751 108.445,87.407 108.445,86.495 v1(108.17,86.22)
  other v1: 108.101,87.751
DEC1_R13: C4_R13.1 U1_R13.B7 | length 1.8
  Inner1 w0.12: v1(127.101,87.751) 127.445,87.407 127.445,86.495 v1(127.17,86.22)
DEC1_R14: C4_R14.1 U1_R14.B7 | length 1.8
  Inner1 w0.12: v1(146.101,87.751) 146.445,87.407 146.445,86.495 v1(146.17,86.22)
DEC1_R21: C4_R21.1 U1_R21.B7 | length 1.8
  Inner1 w0.12: v1(89.101,99.551) 89.445,99.207 89.445,98.295 v1(89.17,98.02)
DEC1_R22: C4_R22.1 U1_R22.B7 | length 1.8
  Inner1 w0.12: v1@108.101,99.551 108.445,99.207 108.445,98.295 v1(108.17,98.02)
  other v1: 108.101,99.551
DEC1_R23: C4_R23.1 U1_R23.B7 | length 1.8
  Inner1 w0.12: v1(127.101,99.551) 127.445,99.207 127.445,98.295 v1(127.17,98.02)
DEC1_R24: C4_R24.1 U1_R24.B7 | length 1.8
  Inner1 w0.12: v1(146.101,99.551) 146.445,99.207 146.445,98.295 v1(146.17,98.02)
DEC1_R31: C4_R31.1 U1_R31.B7 | length 1.8
  Inner1 w0.12: v1(89.101,111.351) 89.445,111.007 89.445,110.095 v1(89.17,109.82)
DEC1_R32: C4_R32.1 U1_R32.B7 | length 1.8
  Inner1 w0.12: v1@108.101,111.351 108.445,111.007 108.445,110.095 v1(108.17,109.82)
  other v1: 108.101,111.351
DEC1_R33: C4_R33.1 U1_R33.B7 | length 1.8
  Inner1 w0.12: v1(127.101,111.351) 127.445,111.007 127.445,110.095 v1(127.17,109.82)
DEC1_R34: C4_R34.1 U1_R34.B7 | length 1.8
  Inner1 w0.12: v1(146.101,111.351) 146.445,111.007 146.445,110.095 v1(146.17,109.82)
DEC1_R41: C4_R41.1 U1_R41.B7 | length 1.8
  Inner1 w0.12: v1(89.101,123.151) 89.445,122.807 89.445,121.895 v1(89.17,121.62)
DEC1_R42: C4_R42.1 U1_R42.B7 | length 1.8
  Inner1 w0.12: v1@108.101,123.151 108.445,122.807 108.445,121.895 v1(108.17,121.62)
  other v1: 108.101,123.151
DEC1_R43: C4_R43.1 U1_R43.B7 | length 1.8
  Inner1 w0.12: v1(127.101,123.151) 127.445,122.807 127.445,121.895 v1(127.17,121.62)
DEC1_R44: C4_R44.1 U1_R44.B7 | length 1.8
  Inner1 w0.12: v1(146.101,123.151) 146.445,122.807 146.445,121.895 v1(146.17,121.62)
DEC1_R51: C4_R51.1 U1_R51.B7 | length 1.8
  Inner1 w0.12: v1(89.101,134.951) 89.445,134.607 89.445,133.695 v1(89.17,133.42)
DEC1_R52: C4_R52.1 U1_R52.B7 | length 1.8
  Inner1 w0.12: v1@108.101,134.951 108.445,134.607 108.445,133.695 v1(108.17,133.42)
  other v1: 108.101,134.951
DEC1_R53: C4_R53.1 U1_R53.B7 | length 1.8
  Inner1 w0.12: v1(127.101,134.951) 127.445,134.607 127.445,133.695 v1(127.17,133.42)
DEC1_R54: C4_R54.1 U1_R54.B7 | length 1.8
  Inner1 w0.12: v1(146.101,134.951) 146.445,134.607 146.445,133.695 v1(146.17,133.42)
DEC2_R11: C7_R11.1 U1_R11.A2 | length 0.5
  Top Layer w0.12: C7_R11.1@90.88,86.926 91.1,87.106 U1_R11.A2@91.1,87.35
DEC2_R12: C7_R12.1 U1_R12.A2 | length 0.5
  Top Layer w0.12: C7_R12.1@109.88,86.925 110.1,87.106 U1_R12.A2@110.1,87.35
DEC2_R13: C7_R13.1 U1_R13.A2 | length 0.5
  Top Layer w0.12: C7_R13.1@128.88,86.925 129.1,87.106 U1_R13.A2@129.1,87.35
DEC2_R14: C7_R14.1 U1_R14.A2 | length 0.5
  Top Layer w0.12: C7_R14.1@147.88,86.925 148.1,87.106 U1_R14.A2@148.1,87.35
DEC2_R21: C7_R21.1 U1_R21.A2 | length 0.5
  Top Layer w0.12: C7_R21.1@90.88,98.726 91.1,98.906 U1_R21.A2@91.1,99.15
DEC2_R22: C7_R22.1 U1_R22.A2 | length 0.5
  Top Layer w0.12: C7_R22.1@109.88,98.725 110.1,98.906 U1_R22.A2@110.1,99.15
DEC2_R23: C7_R23.1 U1_R23.A2 | length 0.5
  Top Layer w0.12: C7_R23.1@128.88,98.725 129.1,98.906 U1_R23.A2@129.1,99.15
DEC2_R24: C7_R24.1 U1_R24.A2 | length 0.5
  Top Layer w0.12: C7_R24.1@147.88,98.725 148.1,98.906 U1_R24.A2@148.1,99.15
DEC2_R31: C7_R31.1 U1_R31.A2 | length 0.5
  Top Layer w0.12: C7_R31.1@90.88,110.526 91.1,110.706 U1_R31.A2@91.1,110.95
DEC2_R32: C7_R32.1 U1_R32.A2 | length 0.5
  Top Layer w0.12: C7_R32.1@109.88,110.525 110.1,110.706 U1_R32.A2@110.1,110.95
DEC2_R33: C7_R33.1 U1_R33.A2 | length 0.5
  Top Layer w0.12: C7_R33.1@128.88,110.525 129.1,110.706 U1_R33.A2@129.1,110.95
DEC2_R34: C7_R34.1 U1_R34.A2 | length 0.5
  Top Layer w0.12: C7_R34.1@147.88,110.525 148.1,110.706 U1_R34.A2@148.1,110.95
DEC2_R41: C7_R41.1 U1_R41.A2 | length 0.5
  Top Layer w0.12: C7_R41.1@90.88,122.326 91.1,122.506 U1_R41.A2@91.1,122.75
DEC2_R42: C7_R42.1 U1_R42.A2 | length 0.5
  Top Layer w0.12: C7_R42.1@109.88,122.325 110.1,122.506 U1_R42.A2@110.1,122.75
DEC2_R43: C7_R43.1 U1_R43.A2 | length 0.5
  Top Layer w0.12: C7_R43.1@128.88,122.325 129.1,122.506 U1_R43.A2@129.1,122.75
DEC2_R44: C7_R44.1 U1_R44.A2 | length 0.5
  Top Layer w0.12: C7_R44.1@147.88,122.325 148.1,122.506 U1_R44.A2@148.1,122.75
DEC2_R51: C7_R51.1 U1_R51.A2 | length 0.5
  Top Layer w0.12: C7_R51.1@90.88,134.126 91.1,134.306 U1_R51.A2@91.1,134.55
DEC2_R52: C7_R52.1 U1_R52.A2 | length 0.5
  Top Layer w0.12: C7_R52.1@109.88,134.125 110.1,134.306 U1_R52.A2@110.1,134.55
DEC2_R53: C7_R53.1 U1_R53.A2 | length 0.5
  Top Layer w0.12: C7_R53.1@128.88,134.125 129.1,134.306 U1_R53.A2@129.1,134.55
DEC2_R54: C7_R54.1 U1_R54.A2 | length 0.5
  Top Layer w0.12: C7_R54.1@147.88,134.125 148.1,134.306 U1_R54.A2@148.1,134.55
DEC3_R11: C6_R11.1 U1_R11.C2 | length 1.2
  Top Layer w0.12: U1_R11.C2@91.1,88.15 91.75,88.15 92.076,87.785 C6_R11.1@92.076,87.71
DEC3_R12: C6_R12.1 U1_R12.C2 | length 1.2
  Top Layer w0.12: U1_R12.C2@110.1,88.15 110.75,88.15 111.076,87.785 C6_R12.1@111.075,87.71
DEC3_R13: C6_R13.1 U1_R13.C2 | length 1.2
  Top Layer w0.12: U1_R13.C2@129.1,88.15 129.75,88.15 130.076,87.785 C6_R13.1@130.076,87.71
DEC3_R14: C6_R14.1 U1_R14.C2 | length 1.2
  Top Layer w0.12: U1_R14.C2@148.1,88.15 148.75,88.15 149.076,87.785 C6_R14.1@149.076,87.71
DEC3_R21: C6_R21.1 U1_R21.C2 | length 1.2
  Top Layer w0.12: U1_R21.C2@91.1,99.95 91.75,99.95 92.076,99.585 C6_R21.1@92.076,99.51
DEC3_R22: C6_R22.1 U1_R22.C2 | length 1.2
  Top Layer w0.12: U1_R22.C2@110.1,99.95 110.75,99.95 111.076,99.585 C6_R22.1@111.075,99.51
DEC3_R23: C6_R23.1 U1_R23.C2 | length 1.2
  Top Layer w0.12: U1_R23.C2@129.1,99.95 129.75,99.95 130.076,99.585 C6_R23.1@130.076,99.51
DEC3_R24: C6_R24.1 U1_R24.C2 | length 1.2
  Top Layer w0.12: U1_R24.C2@148.1,99.95 148.75,99.95 149.076,99.585 C6_R24.1@149.076,99.51
DEC3_R31: C6_R31.1 U1_R31.C2 | length 1.2
  Top Layer w0.12: U1_R31.C2@91.1,111.75 91.75,111.75 92.076,111.385 C6_R31.1@92.076,111.31
DEC3_R32: C6_R32.1 U1_R32.C2 | length 1.2
  Top Layer w0.12: U1_R32.C2@110.1,111.75 110.75,111.75 111.076,111.385 C6_R32.1@111.075,111.31
DEC3_R33: C6_R33.1 U1_R33.C2 | length 1.2
  Top Layer w0.12: U1_R33.C2@129.1,111.75 129.75,111.75 130.076,111.385 C6_R33.1@130.076,111.31
DEC3_R34: C6_R34.1 U1_R34.C2 | length 1.2
  Top Layer w0.12: U1_R34.C2@148.1,111.75 148.75,111.75 149.076,111.385 C6_R34.1@149.076,111.31
DEC3_R41: C6_R41.1 U1_R41.C2 | length 1.2
  Top Layer w0.12: U1_R41.C2@91.1,123.55 91.75,123.55 92.076,123.185 C6_R41.1@92.076,123.11
DEC3_R42: C6_R42.1 U1_R42.C2 | length 1.2
  Top Layer w0.12: U1_R42.C2@110.1,123.55 110.75,123.55 111.076,123.185 C6_R42.1@111.075,123.11
DEC3_R43: C6_R43.1 U1_R43.C2 | length 1.2
  Top Layer w0.12: U1_R43.C2@129.1,123.55 129.75,123.55 130.076,123.185 C6_R43.1@130.076,123.11
DEC3_R44: C6_R44.1 U1_R44.C2 | length 1.2
  Top Layer w0.12: U1_R44.C2@148.1,123.55 148.75,123.55 149.076,123.185 C6_R44.1@149.076,123.11
DEC3_R51: C6_R51.1 U1_R51.C2 | length 1.2
  Top Layer w0.12: U1_R51.C2@91.1,135.35 91.75,135.35 92.076,134.985 C6_R51.1@92.076,134.91
DEC3_R52: C6_R52.1 U1_R52.C2 | length 1.2
  Top Layer w0.12: U1_R52.C2@110.1,135.35 110.75,135.35 111.076,134.985 C6_R52.1@111.075,134.91
DEC3_R53: C6_R53.1 U1_R53.C2 | length 1.2
  Top Layer w0.12: U1_R53.C2@129.1,135.35 129.75,135.35 130.076,134.985 C6_R53.1@130.076,134.91
DEC3_R54: C6_R54.1 U1_R54.C2 | length 1.2
  Top Layer w0.12: U1_R54.C2@148.1,135.35 148.75,135.35 149.076,134.985 C6_R54.1@149.076,134.91
DEC4_R11: C9_R11.1 L2_R11.2 U1_R11.A6 | length 2.9
  Top Layer w0.12: U1_R11.A6@89.5,87.35 89.5,87.07 C9_R11.1@90.16,87.07 ; C9_R11.1@90.16,86.971 C9_R11.1@90.16,87.07 ; 90.545,87.07 C9_R11.1@90.16,87.07
  Top Layer w0.15: L2_R11.2@90.445,85.6 90.545,85.7 90.545,87.07
DEC4_R12: C9_R12.1 L2_R12.2 U1_R12.A6 | length 2.9
  Top Layer w0.12: U1_R12.A6@108.5,87.35 108.5,87.07 C9_R12.1@109.16,87.07 ; C9_R12.1@109.16,86.971 C9_R12.1@109.16,87.07 ; 109.545,87.07 C9_R12.1@109.16,87.07
  Top Layer w0.15: L2_R12.2@109.445,85.6 109.545,85.7 109.545,87.07
DEC4_R13: C9_R13.1 L2_R13.2 U1_R13.A6 | length 2.9
  Top Layer w0.12: U1_R13.A6@127.5,87.35 127.5,87.07 C9_R13.1@128.16,87.07 ; C9_R13.1@128.16,86.971 C9_R13.1@128.16,87.07 ; 128.545,87.07 C9_R13.1@128.16,87.07
  Top Layer w0.15: L2_R13.2@128.445,85.6 128.545,85.7 128.545,87.07
DEC4_R14: C9_R14.1 L2_R14.2 U1_R14.A6 | length 2.9
  Top Layer w0.12: U1_R14.A6@146.5,87.35 146.5,87.07 C9_R14.1@147.16,87.07 ; C9_R14.1@147.16,86.971 C9_R14.1@147.16,87.07 ; 147.545,87.07 C9_R14.1@147.16,87.07
  Top Layer w0.15: L2_R14.2@147.445,85.6 147.545,85.7 147.545,87.07
DEC4_R21: C9_R21.1 L2_R21.2 U1_R21.A6 | length 2.9
  Top Layer w0.12: U1_R21.A6@89.5,99.15 89.5,98.87 C9_R21.1@90.16,98.87 ; C9_R21.1@90.16,98.77 C9_R21.1@90.16,98.87 ; 90.545,98.87 C9_R21.1@90.16,98.87
  Top Layer w0.15: L2_R21.2@90.445,97.4 90.545,97.5 90.545,98.87
DEC4_R22: C9_R22.1 L2_R22.2 U1_R22.A6 | length 2.9
  Top Layer w0.12: U1_R22.A6@108.5,99.15 108.5,98.87 C9_R22.1@109.16,98.87 ; C9_R22.1@109.16,98.77 C9_R22.1@109.16,98.87 ; 109.545,98.87 C9_R22.1@109.16,98.87
  Top Layer w0.15: L2_R22.2@109.445,97.4 109.545,97.5 109.545,98.87
DEC4_R23: C9_R23.1 L2_R23.2 U1_R23.A6 | length 2.9
  Top Layer w0.12: U1_R23.A6@127.5,99.15 127.5,98.87 C9_R23.1@128.16,98.87 ; C9_R23.1@128.16,98.77 C9_R23.1@128.16,98.87 ; 128.545,98.87 C9_R23.1@128.16,98.87
  Top Layer w0.15: L2_R23.2@128.445,97.4 128.545,97.5 128.545,98.87
DEC4_R24: C9_R24.1 L2_R24.2 U1_R24.A6 | length 2.9
  Top Layer w0.12: U1_R24.A6@146.5,99.15 146.5,98.87 C9_R24.1@147.16,98.87 ; C9_R24.1@147.16,98.77 C9_R24.1@147.16,98.87 ; 147.545,98.87 C9_R24.1@147.16,98.87
  Top Layer w0.15: L2_R24.2@147.445,97.4 147.545,97.5 147.545,98.87
DEC4_R31: C9_R31.1 L2_R31.2 U1_R31.A6 | length 2.9
  Top Layer w0.12: U1_R31.A6@89.5,110.95 89.5,110.67 C9_R31.1@90.16,110.67 ; C9_R31.1@90.16,110.57 C9_R31.1@90.16,110.67 ; 90.545,110.67 C9_R31.1@90.16,110.67
  Top Layer w0.15: L2_R31.2@90.445,109.2 90.545,109.3 90.545,110.67
DEC4_R32: C9_R32.1 L2_R32.2 U1_R32.A6 | length 2.9
  Top Layer w0.12: U1_R32.A6@108.5,110.95 108.5,110.67 C9_R32.1@109.16,110.67 ; C9_R32.1@109.16,110.57 C9_R32.1@109.16,110.67 ; 109.545,110.67 C9_R32.1@109.16,110.67
  Top Layer w0.15: L2_R32.2@109.445,109.2 109.545,109.3 109.545,110.67
DEC4_R33: C9_R33.1 L2_R33.2 U1_R33.A6 | length 2.9
  Top Layer w0.12: U1_R33.A6@127.5,110.95 127.5,110.67 C9_R33.1@128.16,110.67 ; C9_R33.1@128.16,110.57 C9_R33.1@128.16,110.67 ; 128.545,110.67 C9_R33.1@128.16,110.67
  Top Layer w0.15: L2_R33.2@128.445,109.2 128.545,109.3 128.545,110.67
DEC4_R34: C9_R34.1 L2_R34.2 U1_R34.A6 | length 2.9
  Top Layer w0.12: U1_R34.A6@146.5,110.95 146.5,110.67 C9_R34.1@147.16,110.67 ; C9_R34.1@147.16,110.57 C9_R34.1@147.16,110.67 ; 147.545,110.67 C9_R34.1@147.16,110.67
  Top Layer w0.15: L2_R34.2@147.445,109.2 147.545,109.3 147.545,110.67
DEC4_R41: C9_R41.1 L2_R41.2 U1_R41.A6 | length 2.9
  Top Layer w0.12: U1_R41.A6@89.5,122.75 89.5,122.47 C9_R41.1@90.16,122.47 ; C9_R41.1@90.16,122.371 C9_R41.1@90.16,122.47 ; 90.545,122.47 C9_R41.1@90.16,122.47
  Top Layer w0.15: L2_R41.2@90.445,121 90.545,121.1 90.545,122.47
DEC4_R42: C9_R42.1 L2_R42.2 U1_R42.A6 | length 2.9
  Top Layer w0.12: U1_R42.A6@108.5,122.75 108.5,122.47 C9_R42.1@109.16,122.47 ; C9_R42.1@109.16,122.371 C9_R42.1@109.16,122.47 ; 109.545,122.47 C9_R42.1@109.16,122.47
  Top Layer w0.15: L2_R42.2@109.445,121 109.545,121.1 109.545,122.47
DEC4_R43: C9_R43.1 L2_R43.2 U1_R43.A6 | length 2.9
  Top Layer w0.12: U1_R43.A6@127.5,122.75 127.5,122.47 C9_R43.1@128.16,122.47 ; C9_R43.1@128.16,122.371 C9_R43.1@128.16,122.47 ; 128.545,122.47 C9_R43.1@128.16,122.47
  Top Layer w0.15: L2_R43.2@128.445,121 128.545,121.1 128.545,122.47
DEC4_R44: C9_R44.1 L2_R44.2 U1_R44.A6 | length 2.9
  Top Layer w0.12: U1_R44.A6@146.5,122.75 146.5,122.47 C9_R44.1@147.16,122.47 ; C9_R44.1@147.16,122.371 C9_R44.1@147.16,122.47 ; 147.545,122.47 C9_R44.1@147.16,122.47
  Top Layer w0.15: L2_R44.2@147.445,121 147.545,121.1 147.545,122.47
DEC4_R51: C9_R51.1 L2_R51.2 U1_R51.A6 | length 2.9
  Top Layer w0.12: U1_R51.A6@89.5,134.55 89.5,134.27 C9_R51.1@90.16,134.27 ; C9_R51.1@90.16,134.17 C9_R51.1@90.16,134.27 ; 90.545,134.27 C9_R51.1@90.16,134.27
  Top Layer w0.15: L2_R51.2@90.445,132.8 90.545,132.9 90.545,134.27
DEC4_R52: C9_R52.1 L2_R52.2 U1_R52.A6 | length 2.9
  Top Layer w0.12: U1_R52.A6@108.5,134.55 108.5,134.27 C9_R52.1@109.16,134.27 ; C9_R52.1@109.16,134.17 C9_R52.1@109.16,134.27 ; 109.545,134.27 C9_R52.1@109.16,134.27
  Top Layer w0.15: L2_R52.2@109.445,132.8 109.545,132.9 109.545,134.27
DEC4_R53: C9_R53.1 L2_R53.2 U1_R53.A6 | length 2.9
  Top Layer w0.12: U1_R53.A6@127.5,134.55 127.5,134.27 C9_R53.1@128.16,134.27 ; C9_R53.1@128.16,134.17 C9_R53.1@128.16,134.27 ; 128.545,134.27 C9_R53.1@128.16,134.27
  Top Layer w0.15: L2_R53.2@128.445,132.8 128.545,132.9 128.545,134.27
DEC4_R54: C9_R54.1 L2_R54.2 U1_R54.A6 | length 2.9
  Top Layer w0.12: U1_R54.A6@146.5,134.55 146.5,134.27 C9_R54.1@147.16,134.27 ; C9_R54.1@147.16,134.17 C9_R54.1@147.16,134.27 ; 147.545,134.27 C9_R54.1@147.16,134.27
  Top Layer w0.15: L2_R54.2@147.445,132.8 147.545,132.9 147.545,134.27
GND_P11: C50_P11.2 C51_P11.2 C52_P11.2 C53_P11.2 C56_P11.2 C60_P11.2 C63_P11.2 D10_P11.2 D12_P11.2 D13_P11.2 pad.JP6@85.723,86.42 pad.JP9@85.723,88.94 R50_P11.2 TH5_P11.2 U10_P11.A4 U10_P11.D3 U11_P11.1 U11_P11.2 U11_P11.3 U11_P11.6 U11_P11.7 U11_P11.9 U12_P11.4 U13_P11.B2 | length 2.5
  Top Layer w0.15: v1(84.65,89.275) U11_P11.2@85.15,89.275 U11_P11.1@85.651,89.275 ; C60_P11.2@84.696,86.41 v1(85.05,86.41)
  Top Layer w0.2: U11_P11.7@83.975,87.6 U11_P11.6@83.975,88.1 v1(83.974,88.129)
  Bottom Layer w0.15: 83.942,88.676 U13_P11.B2@84.175,88.676 ; U10_P11.D3@84.251,86.9 v5(84.251,86.93) ; v5(85.051,89) D10_P11.2@85.051,89.049
  Bottom Layer w0.25: v4(86.404,83.867) C52_P11.2@86.404,84.15
  other v1: 84.977,84.929 86.301,84.97 84.558,85.501 83.78,86.887 84.651,86.926 86.344,87.687 85.2,88.087 85.7,89.2 86.2,89.387 85.051,90.877
  other v3: 85.345,91.643 86.1,91.701
  other v4: 85.8,84.22 84.004,89.936 84.15,90.387 84.534,90.945 85.75,91.987 86.268,92.276
  other v5: 85.041,85.05 84.449,85.536 85.724,86.42 83.85,88.099 83.779,88.567 85.724,88.94 84.531,90.469 86.15,90.65
  other v6: 85.431,85.276 85.944,85.385 84.535,86.064 85.499,88.489 84.2,88.8
GND_P12: C50_P12.2 C51_P12.2 C52_P12.2 C53_P12.2 C56_P12.2 C60_P12.2 C63_P12.2 D10_P12.2 D12_P12.2 D13_P12.2 pad.JP6@104.725,86.42 pad.JP9@104.725,88.94 R50_P12.2 TH5_P12.2 U10_P12.A4 U10_P12.D3 U11_P12.1 U11_P12.2 U11_P12.3 U11_P12.6 U11_P12.7 U11_P12.9 U12_P12.4 U13_P12.B2 | length 2.5
  Top Layer w0.15: v1(103.65,89.275) U11_P12.2@104.15,89.275 U11_P12.1@104.65,89.275 ; C60_P12.2@103.694,86.41 v1(104.05,86.41)
  Top Layer w0.2: U11_P12.7@102.975,87.6 U11_P12.6@102.975,88.1 v1(102.974,88.129)
  Bottom Layer w0.15: 102.942,88.676 U13_P12.B2@103.175,88.676 ; U10_P12.D3@103.25,86.9 v5(103.251,86.93) ; v5(104.051,89) D10_P12.2@104.05,89.05
  Bottom Layer w0.25: v4@105.404,83.867 C52_P12.2@105.404,84.15
  other v1: 103.977,84.929 105.301,84.97 103.558,85.501 102.78,86.887 103.65,86.926 105.344,87.687 104.2,88.087 104.7,89.2 105.2,89.387 104.051,90.877
  other v3: 104.345,91.643 105.1,91.701
  other v4: 105.404,83.867 104.8,84.22 103.004,89.936 103.15,90.387 103.534,90.945 104.75,91.987 105.268,92.276
  other v5: 104.041,85.05 103.449,85.536 104.724,86.42 102.85,88.099 102.779,88.567 104.724,88.94 103.531,90.469 105.15,90.65
  other v6: 104.431,85.276 104.944,85.385 103.535,86.064 104.499,88.489 103.2,88.8
GND_P13: C50_P13.2 C51_P13.2 C52_P13.2 C53_P13.2 C56_P13.2 C60_P13.2 C63_P13.2 D10_P13.2 D12_P13.2 D13_P13.2 pad.JP6@123.724,86.42 pad.JP9@123.724,88.94 R50_P13.2 TH5_P13.2 U10_P13.A4 U10_P13.D3 U11_P13.1 U11_P13.2 U11_P13.3 U11_P13.6 U11_P13.7 U11_P13.9 U12_P13.4 U13_P13.B2 | length 2.5
  Top Layer w0.15: v1(122.65,89.275) U11_P13.2@123.15,89.275 U11_P13.1@123.65,89.275 ; C60_P13.2@122.694,86.41 v1(123.05,86.41)
  Top Layer w0.2: U11_P13.7@121.974,87.599 121.974,88.099 v1(121.974,88.129)
  Bottom Layer w0.15: 121.942,88.676 U13_P13.B2@122.175,88.676 ; U10_P13.D3@122.25,86.9 v5(122.251,86.93) ; v5(123.051,89) D10_P13.2@123.05,89.05
  Bottom Layer w0.25: v4(124.404,83.867) C52_P13.2@124.404,84.15
  other v1: 122.977,84.929 124.301,84.97 122.558,85.501 121.78,86.887 122.649,86.926 124.344,87.687 123.2,88.087 123.7,89.2 124.2,89.387 123.051,90.877
  other v3: 123.345,91.643 124.1,91.701
  other v4: 123.8,84.22 122.004,89.936 122.15,90.387 122.534,90.945 123.75,91.987 124.268,92.276
  other v5: 123.041,85.05 122.449,85.536 123.724,86.42 121.85,88.099 121.779,88.567 123.724,88.94 122.531,90.469 124.15,90.65
  other v6: 123.431,85.276 123.944,85.385 122.535,86.064 123.499,88.489 122.2,88.8
GND_P14: C50_P14.2 C51_P14.2 C52_P14.2 C53_P14.2 C56_P14.2 C60_P14.2 C63_P14.2 D10_P14.2 D12_P14.2 D13_P14.2 pad.JP6@142.723,86.42 pad.JP9@142.723,88.94 R50_P14.2 TH5_P14.2 U10_P14.A4 U10_P14.D3 U11_P14.1 U11_P14.2 U11_P14.3 U11_P14.6 U11_P14.7 U11_P14.9 U12_P14.4 U13_P14.B2 | length 2.5
  Top Layer w0.15: v1(141.65,89.275) U11_P14.2@142.15,89.275 U11_P14.1@142.651,89.275 ; C60_P14.2@141.696,86.41 v1(142.05,86.41)
  Top Layer w0.2: U11_P14.7@140.975,87.6 U11_P14.6@140.975,88.1 v1(140.974,88.129)
  Bottom Layer w0.15: 140.942,88.676 U13_P14.B2@141.175,88.676 ; U10_P14.D3@141.251,86.9 v5(141.251,86.93) ; v5(142.051,89) D10_P14.2@142.051,89.049
  Bottom Layer w0.25: v4(143.404,83.867) C52_P14.2@143.404,84.15
  other v1: 141.977,84.929 143.301,84.97 141.558,85.501 140.78,86.887 141.651,86.926 143.344,87.687 142.2,88.087 142.7,89.2 143.2,89.387 142.051,90.877
  other v3: 142.345,91.643 143.1,91.701
  other v4: 142.8,84.22 141.004,89.936 141.15,90.387 141.534,90.945 142.75,91.987 143.268,92.276
  other v5: 142.041,85.05 141.449,85.536 142.724,86.42 140.85,88.099 140.779,88.567 142.724,88.94 141.531,90.469 143.15,90.65
  other v6: 142.431,85.276 142.944,85.385 141.535,86.064 142.499,88.489 141.2,88.8
GND_P21: C50_P21.2 C51_P21.2 C52_P21.2 C53_P21.2 C56_P21.2 C60_P21.2 C63_P21.2 D10_P21.2 D12_P21.2 D13_P21.2 pad.JP6@85.723,98.221 pad.JP9@85.723,100.741 R50_P21.2 TH5_P21.2 U10_P21.A4 U10_P21.D3 U11_P21.1 U11_P21.2 U11_P21.3 U11_P21.6 U11_P21.7 U11_P21.9 U12_P21.4 U13_P21.B2 | length 2.5
  Top Layer w0.15: v1(84.65,101.075) U11_P21.2@85.15,101.075 U11_P21.1@85.651,101.075 ; C60_P21.2@84.696,98.21 v1(85.05,98.21)
  Top Layer w0.2: U11_P21.7@83.974,99.399 83.974,99.899 v1(83.974,99.929)
  Bottom Layer w0.15: 83.942,100.476 U13_P21.B2@84.175,100.475 ; U10_P21.D3@84.251,98.7 v5(84.251,98.73) ; v5(85.051,100.8) D10_P21.2@85.051,100.849
  Bottom Layer w0.25: v4(86.404,95.667) C52_P21.2@86.404,95.95
  other v1: 84.977,96.729 86.301,96.77 84.558,97.301 83.78,98.687 84.651,98.724 86.344,99.487 85.2,99.887 85.7,101 86.2,101.187 85.051,102.677
  other v3: 85.345,103.443 86.1,103.501
  other v4: 85.8,96.02 84.004,101.736 84.15,102.187 84.534,102.745 85.75,103.787 86.268,104.076
  other v5: 85.041,96.85 84.449,97.336 85.724,98.22 83.85,99.899 83.779,100.367 85.724,100.74 84.531,102.269 86.15,102.45
  other v6: 85.431,97.076 85.944,97.185 84.535,97.864 85.499,100.289 84.2,100.6
GND_P22: C50_P22.2 C51_P22.2 C52_P22.2 C53_P22.2 C56_P22.2 C60_P22.2 C63_P22.2 D10_P22.2 D12_P22.2 D13_P22.2 pad.JP6@104.725,98.221 pad.JP9@104.725,100.741 R50_P22.2 TH5_P22.2 U10_P22.A4 U10_P22.D3 U11_P22.1 U11_P22.2 U11_P22.3 U11_P22.6 U11_P22.7 U11_P22.9 U12_P22.4 U13_P22.B2 | length 2.5
  Top Layer w0.15: v1(103.65,101.075) U11_P22.2@104.15,101.075 U11_P22.1@104.65,101.075 ; C60_P22.2@103.694,98.21 v1(104.05,98.21)
  Top Layer w0.2: U11_P22.7@102.974,99.399 102.974,99.899 v1(102.974,99.929)
  Bottom Layer w0.15: 102.942,100.476 U13_P22.B2@103.175,100.475 ; U10_P22.D3@103.25,98.7 v5(103.251,98.73) ; v5(104.051,100.8) D10_P22.2@104.051,100.849
  Bottom Layer w0.25: v4@105.404,95.667 C52_P22.2@105.404,95.95
  other v1: 103.977,96.729 105.301,96.77 103.558,97.301 102.78,98.687 103.65,98.724 105.344,99.487 104.2,99.887 104.7,101 105.2,101.187 104.051,102.677
  other v3: 104.345,103.443 105.1,103.501
  other v4: 105.404,95.667 104.8,96.02 103.004,101.736 103.15,102.187 103.534,102.745 104.75,103.787 105.268,104.076
  other v5: 104.041,96.85 103.449,97.336 104.724,98.22 102.85,99.899 102.779,100.367 104.724,100.74 103.531,102.269 105.15,102.45
  other v6: 104.431,97.076 104.944,97.185 103.535,97.864 104.499,100.289 103.2,100.6
GND_P23: C50_P23.2 C51_P23.2 C52_P23.2 C53_P23.2 C56_P23.2 C60_P23.2 C63_P23.2 D10_P23.2 D12_P23.2 D13_P23.2 pad.JP6@123.724,98.221 pad.JP9@123.724,100.741 R50_P23.2 TH5_P23.2 U10_P23.A4 U10_P23.D3 U11_P23.1 U11_P23.2 U11_P23.3 U11_P23.6 U11_P23.7 U11_P23.9 U12_P23.4 U13_P23.B2 | length 2.5
  Top Layer w0.15: v1(122.65,101.075) U11_P23.2@123.15,101.075 U11_P23.1@123.65,101.075 ; C60_P23.2@122.694,98.21 v1(123.05,98.21)
  Top Layer w0.2: U11_P23.7@121.974,99.399 121.974,99.899 v1(121.974,99.929)
  Bottom Layer w0.15: 121.942,100.476 U13_P23.B2@122.175,100.475 ; U10_P23.D3@122.25,98.7 v5(122.251,98.73) ; v5(123.051,100.8) D10_P23.2@123.051,100.849
  Bottom Layer w0.25: v4(124.404,95.667) C52_P23.2@124.404,95.95
  other v1: 122.977,96.729 124.301,96.77 122.558,97.301 121.78,98.687 122.649,98.724 124.344,99.487 123.2,99.887 123.7,101 124.2,101.187 123.051,102.677
  other v3: 123.345,103.443 124.1,103.501
  other v4: 123.8,96.02 122.004,101.736 122.15,102.187 122.534,102.745 123.75,103.787 124.268,104.076
  other v5: 123.041,96.85 122.449,97.336 123.724,98.22 121.85,99.899 121.779,100.367 123.724,100.74 122.531,102.269 124.15,102.45
  other v6: 123.431,97.076 123.944,97.185 122.535,97.864 123.499,100.289 122.2,100.6